# Altium PCB PCB.PcbDoc
Units mil, origin at the board's own origin, x right, y up, seen from the top; angles counter-clockwise.
Board outline 6000 x 4000 mil, 2 copper layers (Top Layer, Bottom Layer); 40 components, 27 nets, 94 pads, 5 vias.
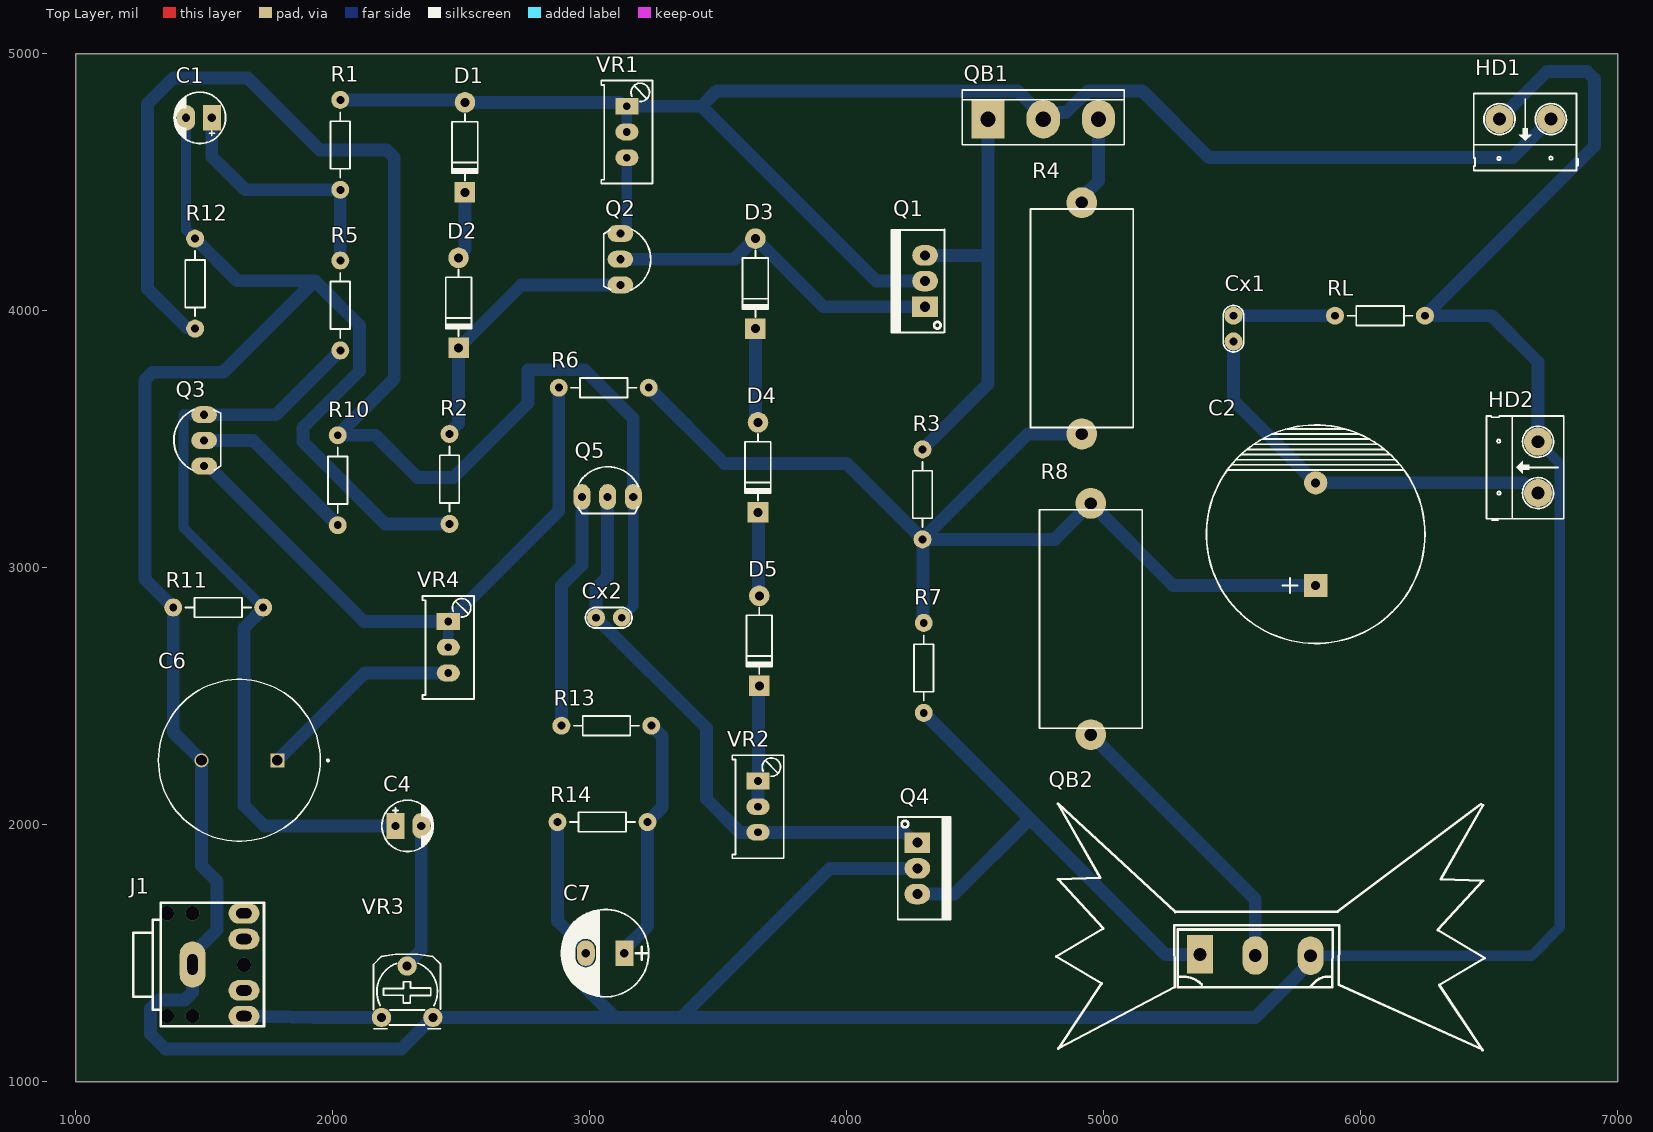
[diagram p0: Top Layer view]
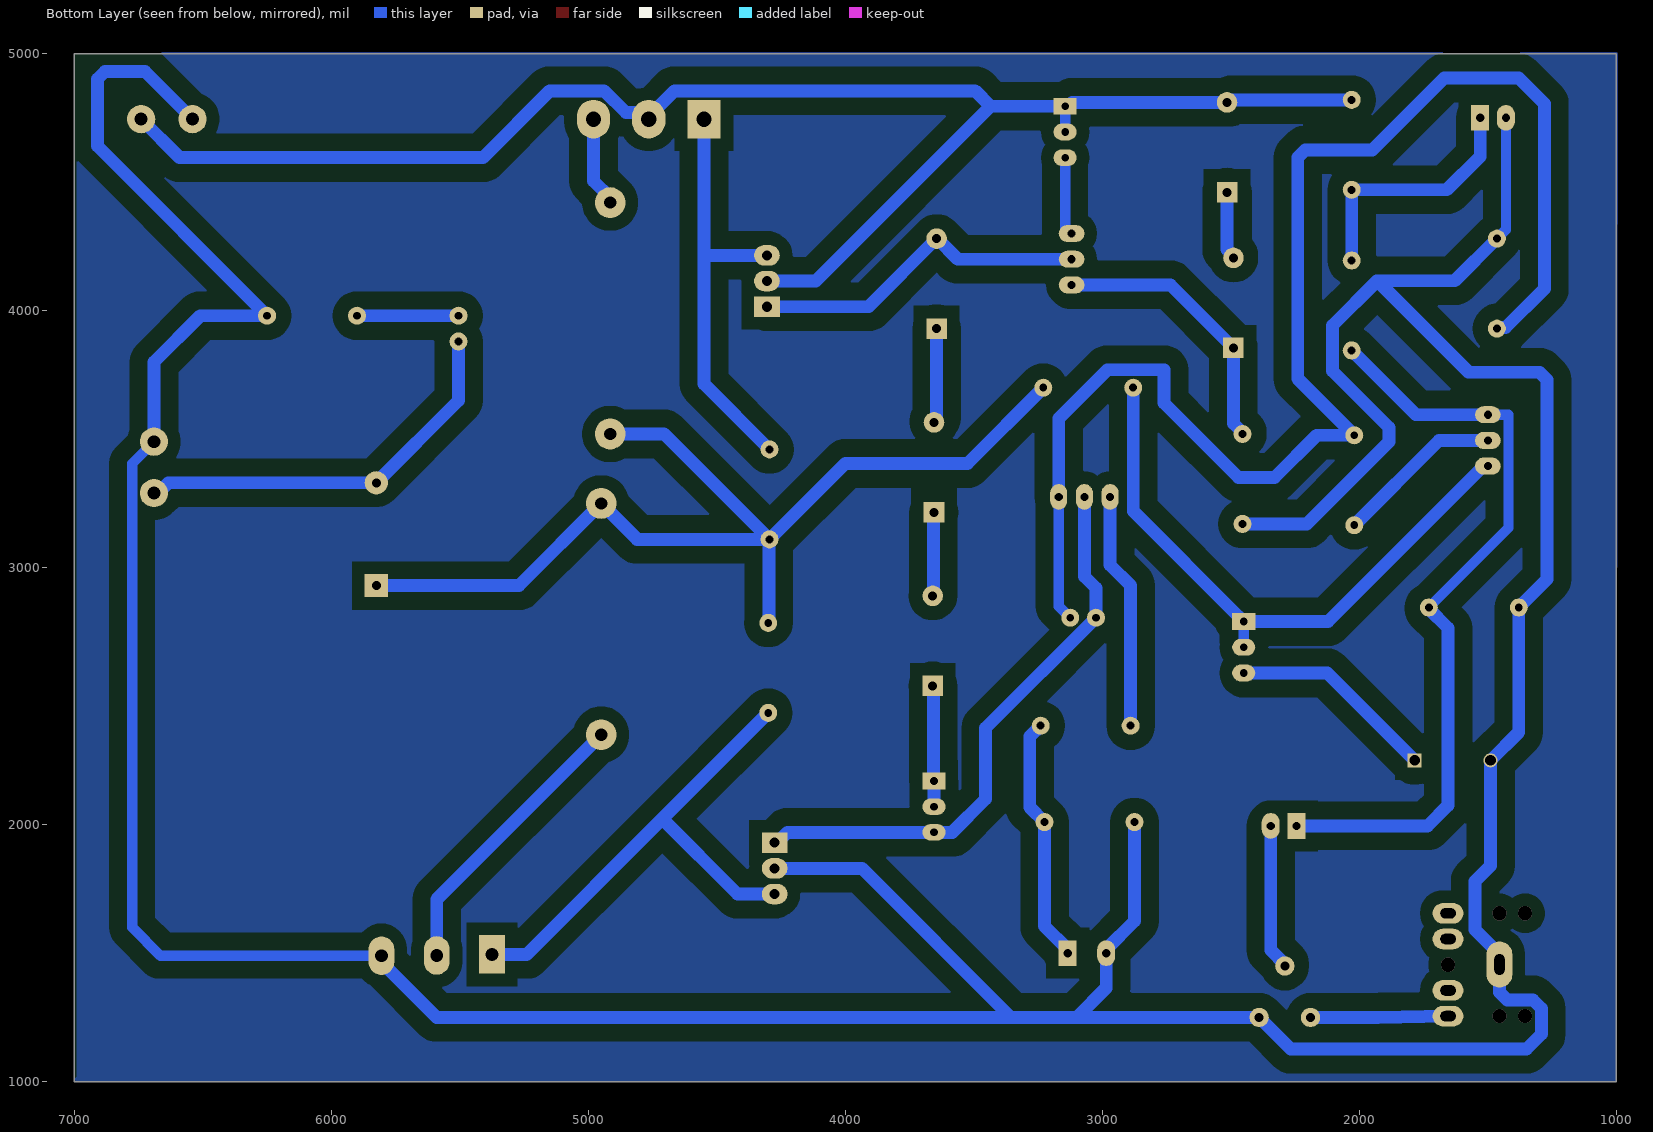
[diagram p1: Bottom Layer view, seen from below]
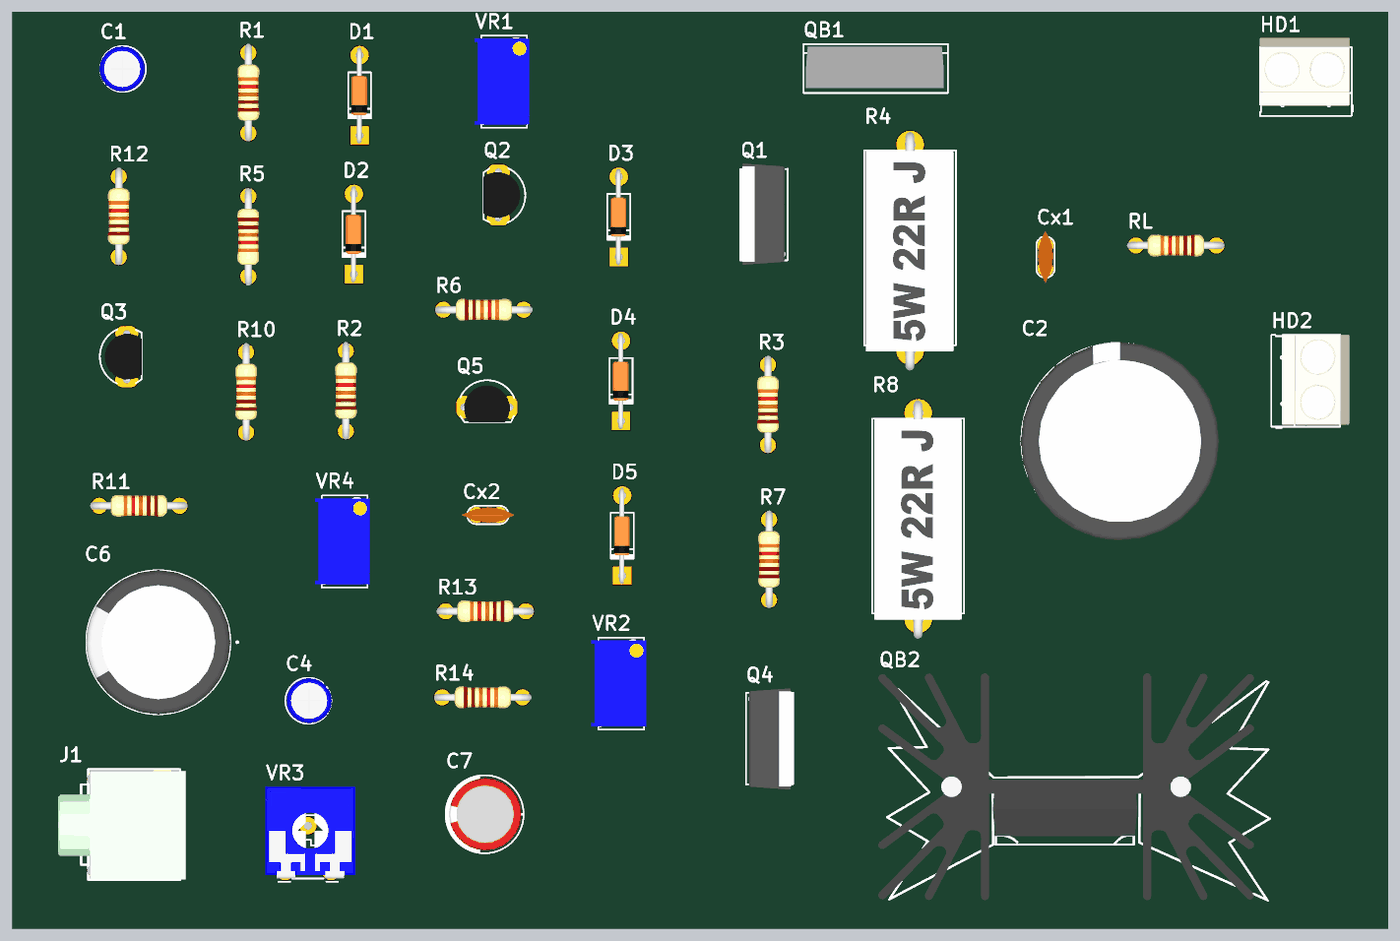
[diagram p2: 3D render of the assembled board from above, using the file's embedded part models]

## Layer stack, top to bottom
Top Solder: solder mask 0.4, Solder Resist, Dk 3.5
Top Layer: signal copper 1.4
Dielectric 1: dielectric 12.6, FR-4, Dk 4.8
Bottom Layer: signal copper 1.4
Bottom Solder: solder mask 0.4, Solder Resist, Dk 3.5

## Board outline
1000,1000 7000,1000 7000,5000 1000,5000

## Design rules (kind name [scope] priority, off if disabled: settings)
Clearance [All] p1: gap=10 ignorepadtopadclearanceinfootprint=FALSE except(0: Arc-Hole Track-Hole SMDPad-Hole THPad-Hole Via-Hole Fill-Hole Poly-Hole Region-Hole Text-Hole; 50: SMDPad-Fill SMDPad-Poly SMDPad-Region THPad-Fill THPad-Poly THPad-Region Via-Fill Via-Poly Via-Region Fill-Fill Fill-Poly Fill-Region Poly-Poly Poly-Region Region-Region; 70: Arc-Fill Arc-Poly Arc-Region Track-Fill Track-Poly Track-Region)
PolygonConnect [All] p1: connectstyle=Relief reliefconductorwidth=10 reliefentries=4 polygonreliefangle="90 Angle" airgapwidth=10
RoutingLayers [All] p1: top layer_v5=FALSE bottom layer_v5=TRUE
RoutingVias [All] p1: holewidth=28 width=50 viastyle="Through Hole" minholewidth=28 minwidth=50 maxholewidth=28 maxwidth=50
SolderMaskExpansion [All] p1: expansion=4 istentingtop=FALSE
Width [All] p1: maxlimit=80 minlimit=10 preferedwidth=50 toplayer_maxwidth=10 toplayer_prefwidth=10 bottomlayer_minwidth=50 minimp=50.000000 maximp=50.000000 favimp=50.000000
29 further rules are at their usual default settings.

## Components (designator, comment, footprint, x,y, rotation, side; value= is the part's Value field where it differs from the comment)
C1 "0.1uF" CP1/2 1530,4750 r180 top value=10uF/50V
C2 "10000uF" CP4/8.5 5825,2930 r90 top value=4700uF/50V
C4 "0.56uF" CP1/2 2245,1995 r0 top value=10uF/50V
C6 "470uF/100V" CAPPRD750W80D1600H2500 1637.36,2250 r180 top
C7 "330uF/35V" CP1.5/3.4 3135,1500 r180 top value=100uF/35V/50V
Cx1 "1nF" CN1 5505,3930 r270 top value=100pF
Cx2 "150pF" CN1 3075,2805 r180 top value=100pF
D1 "1N4007" D1A 2515,4810 r90 top
D2 "1N4007" D1A 2490,4205 r90 top
D3 "1N4007" D1A 3645,4280 r90 top
D4 "1N4007" D1A 3655,3565 r90 top
D5 "1N4007" D1A 3660,2890 r90 top
HD1 "Header 2" HED2 6740,4745 r180 top
HD2 "Header 2" HED2 6690,3290 r90 top
J1 "Jac Phone2" JacPhone2 1555,1455 r90 top
Q1 "TIP41C" QTO-220 4305,4015 r90 top
Q2 "A1015" QTO-92 3120,4200 r270 top
Q3 "A1015" QTO-92 1500,3495 r90 top
Q4 "TIP42C" QTO-220 4275,1930 r270 top
Q5 "C2383" QTO-92 3070,3275 r0 top value=C1815
QB1 "D718" QTO-247 4550,4745 r0 top
QB2 "2SB688" TO247+LageHeatsink 5390,1490 r0 top value=B688
R1 "Res1" R1/4W 2030,4820 r270 top value=680k
R2 "Res1" R1/4W 2455,3520 r270 top value=10k
R3 "Res1" R1/4W 4295,3460 r270 top value=220
R4 "R5W - 0,47" R5W 4915,3520 r90 top value="R5W - 0,47R"
R5 "Res1" R1/4W 2030,3845 r90 top value=270k
R6 "Res1" R1/4W 3230,3700 r180 top value=20k
R7 "Res1" R1/4W 4300,2785 r270 top value=220
R8 "R5W - 0,47" R5W 4950,2350 r90 top value="R5W - 0,47R"
R10 "Res1" R1/4W 2020,3515 r270 top value=33k
R11 "Res1" R1/4W 1380,2845 r0 top value=820k
R12 "Res1" R1/4W 1465,4280 r270 top value=6k8
R13 "Res1" R1/4W 2890,2385 r0 top value=47
R14 "Res1" R1/4W 3225,2010 r180 top value=100
RL "Res1" R1/4W 5900,3980 r0 top value=4.7
VR1 "100" VR1 3145,4795 r270 top value="VR 10K"
VR2 "100" VR1 3655,2170 r270 top value="VR 10K"
VR3 "50k" VR 2190,1250 r0 top value="VR 10K"
VR4 "5k" VR1 2450,2790 r270 top value="VR 10K"

## Footprints (in the part's own frame and the unit in brackets; to place one, negate y for a bottom-side part, rotate by r counter-clockwise, add the part's x,y. Pads: shape width x height; smd on the part's side, far side on the other; paste and mask are expansions set on the pad)
CAPPRD750W80D1600H2500 [mm]
  round 1.4 hole 1.05: N(3.75,0)
  rect 1.4x1.4 hole 1.05: P(-3.75,0)
  silkscreen extent -8.85,-8 8,8, body extent -8,-8 8,8, height 25
CN1 [mil]
  round 70 hole 31: 1(-50,0) 2(50,0)
  silkscreen extent -90,-40 91,40, body extent -115,-33 115,33, height 265
CP1.5/3.4 [mil] "Tu hoa 220->470uF,16V, 470uF/16V,25V"
  rect 70x100 hole 32: 1(0,0)
  oval 70x100 hole 32: 2(150,0)
  silkscreen extent -95,-170 245,170, body extent -85,-157 230,157, height 446
CP1/2 [mil] "Tu hoa < 22uF/16>50V"
  rect 70x100 hole 32: 1(0,0)
  oval 70x100 hole 32: 2(100,0)
  silkscreen extent -53,-100 147,100, body extent -49,-99 149,99, height 287
CP4/8.5 [mil] "Tu hoa 4700uF/50V"
  rect 90x90 hole 35: 1(0,0)
  round 90 hole 35: 2(400,0)
  silkscreen extent -225,-425 625,425, body extent -236,-438 630,428, height 984
D1A [mil] "Diode 1A, W 100mil, L 350mil"
  round 80 hole 35: 1(0,0)
  rect 80x80 hole 35: 2(-350,0)
  silkscreen extent -305,-50 -45,50, body extent -386,-33 34,36, height 84
HED2 [mil] "Header 2, 2 pin, hight 300mil, Pin to Pin 200, Colour Green"
  round 110 hole 50: 1(0,0) 2(200,0)
  silkscreen extent -106,-100 300,200, body extent -92,-140 302,155, height 394
JacPhone2 [mil] "Jac Phone Stereo"
  oval 80x120 hole 40 slot 60 at 90 deg: 1(-200,-100) 2(-100,-100) 3(100,-100) 4(200,-100)
  oval 180x100 hole 40 slot 80 at 0 deg: 5(1,100)
  silkscreen extent -240,-178 241,330, body extent -239,-202 233,354, height 394
QTO-92 [mil] "TO-92"
  oval 66x100 hole 32: 1(-100,0) 2(0,0) 3(100,0)
  silkscreen extent -117,-65 120,118, body extent -109,-66 109,95, height 245
QTO-220 [mil] "TO-220 - 1-2-3"
  rect 80x100 hole 39: 1(0,0)
  oval 80x100 hole 39: 2(100,0) 3(200,0)
  silkscreen extent -100,-76 300,130, body extent -119,-64 322,121, height 755
QTO-247 [mil] "TO-247"
  rect 130x150 hole 60: 1(0,0)
  oval 130x150 hole 60: 2(215,0) 3(430,0)
  silkscreen extent -100,-100 530,113, body extent -89,-78 511,102, height 941
R1/4W [mil] "R 1/4W, 2 Pin, 350mil"
  round 70 hole 31: 1(0,0) 2(350,0)
  silkscreen extent 48,-38 302,38, body extent -40,-47 386,47, height 111
R5W [mil] "R5W , 2 pin, 400 x 950mil"
  round 120 hole 47.24: 1(0,0) 2(900,0)
  silkscreen extent 25,-200 875,200, body extent -85,-190 955,192, height 363
TO247+LageHeatsink [mil]
  rect 100x150 hole 50: 1(-15,5)
  oval 100x150 hole 50: 2(200,1) 3(415,0)
  silkscreen extent -575,-367 1093,592, body extent -614,-365 1024,625, height 2600
VR [mil] "Resistor Variable"
  round 75 hole 35: 1(0,0) 2(100,200) 3(200,0)
  silkscreen extent -31,-44 231,246, body extent -87,-30 307,372, height 165
VR1 [mil] "Variable Resistor"
  rect 65x90 hole 30: 1(0,0)
  oval 65x90 hole 30: 2(100,0) 3(200,0)
  silkscreen extent -100,-100 301,100, body extent -88,-130 288,110, height 455

## Part data
C1 C4: library part CP1, "Cap P  0,1uF < 22uF , 16 - 50V", Description 1="10 => 220uF/6,3V/10V - 10uF => 100uF/16V", Description 2="0,1uF => 33uF/50V - 10uF => 22uF/63V", Description 3="0,47uF => 10uF/100V"
C2: library part CP7, "Cap 4700uF/50V"
C6: library part ECA2AHG471, "470ÂµF 100V Aluminum Electrolytic Capacitors Radial, Can 2000 Hrs @ 105Â°C", Package="RADIAL-2 Panasonic", Availability="In Stock", Check_prices=https://www.snapeda.com/parts/ECA2AHG471/Panasonic/view-part/?ref=eda, MF=Panasonic, MP=ECA2AHG471, Price=None, SnapEDA_Link=https://www.snapeda.com/parts/ECA2AHG471/Panasonic/view-part/?ref=snap
C7: library part CP3, "Cap 100uF/35V - 470uF/16V", Description 1="1000uF/6,3V - 470uF/16V - 330uF - 25V", Description 2="220uF/35V - 100uF/50V - 63V - 4,7uF/200V", Description 3="22uF => 33uF100V - 3,3uF => 4,7uF/250V", Description 4="2,2uF =>3,3uF/350 - 2,2uF/400V - 1uF/450V"
Cx1 Cx2: library part CN1, "Cap np  1pF - 472pF"
D1 D2 D3 D4 D5: library part D1A, "Diode 1A"
HD1 HD2: library part Hed2, "Header 2 (Green)"
J1: "Jac Phone Stereo", Creat by=VanDungEvn@Gmail.com
Q1: "NPN 2W, BCE"
Q2 Q3: "PNP 600mW, ECB"
Q4: "PNP 2W, BCE"
Q5: library part NPN_ECB, "P 600mW, ECB"
QB1 QB2: "Transistor Power Supply"
R1 R2 R3 R5 R6 R7 R10 R11 R12 R13 R14 RL: library part Res1_1, "Resistor", Manufacturer="Generic Components", Class=Passive, Published=08/06/2000, Publisher="Altium Hobart Technology Centre", SubClass=Resistor
R4 R8: library part R5W, "Resistor 5W"
VR1 VR2 VR4: library part VR1, "Var Resistor"
VR3: library part VR, "Var Resistor"

## Via types
v1: diameter 55, hole 55, Top Layer to Bottom Layer, 5 vias

## Nets (pads, with @x,y where several pads share a name; then routed paths per layer and width w, separated by ;. In a path a pad name is that pad's centre, name@x,y a point inside that pad or via, vN(x,y) a via of type N, cw(c..) or ccw(c..) an arc to the next point about the centre after c; other vN are vias at no path point)
GND: C1.2 C6.N C7.2 HD1.2 HD2.2 J1.5 Q4.2 QB2.3 R2.2 R11.1 R12.1 R14.2 RL.2 VR3.3 | length 18291.5
  Bottom Layer w40: C1.2 1430,4315 R12.1 ; QB2.3 6665,1490 6775,1600 6775,3405 HD2.2
  Bottom Layer w50: R12.1 1629,4116 1931,4116 ; R2.2 2205,3170 1885,3490 1885,3545 2105,3765 2105,3942 1931,4116 ; R14.2 2875,1625 2985,1515 C7.2 2985,1365 3100,1250 ; Q4.2 3935.02,1830 3355.02,1250 ; QB2.3 5805,1465 5590,1250 3355.02,1250 ; HD1.2 6725,4930 6880.71,4930 6910,4900.71 6910,4640 RL.2 6510,3980 6690,3800 HD2.2 ; 1931,4116 1575,3760 1299.29,3760 1270,3730.71 1270,2955 R11.1 1380,2359.72 C6.N 1489.72,1840.28 1550,1780 1550,1591 1455,1496 J1.5 1455,1348 1425,1318 1325,1318 1292,1285 1292,1185 1350,1127 2267,1127 VR3.3 3100,1250 ; 3100,1250 3355.02,1250
NetC1_1: C1.1 R1.2 R5.2 | length 978.8
  Bottom Layer w50: C1.1 1530,4600 1660,4470 R1.2 R5.2
NetC2_1: C2.1 R3.2 R4.1 R6.1 R7.1 R8.2 | length 4146.8
  Bottom Layer w50: R6.1 3525,3405 4000,3405 R3.2 ; R7.1 4297.5,2787.5 4297.5,3107.5 R3.2 ; R4.1 4705,3520 R3.2 ; C2.1 5270,2930 R8.2 4810,3110 R3.2
NetC2_2: C2.2 Cx1.2 HD2.1 | length 1564.1
  Bottom Layer w50: Cx1.2 5505,3650 C2.2 6633.76,3330 6673.76,3290 HD2.1
NetC4_1: C4.1 Q3.3 R5.1 R11.2 | length 3016.2
  Bottom Layer w40: Q3.3 1420,3595 1420,3155 R11.2
  Bottom Layer w50: Q3.3 1780,3595 R5.1 ; R11.2 1730,2839.59 1655,2764.59 1655,2075 1735,1995 C4.1
NetC4_2: C4.2 VR3.2 | length 567.8
  Bottom Layer w50: VR3.2 2290,1456.76 2345,1511.76 C4.2
NetC6_P: C6.P VR4.3 | length 805.8
  Bottom Layer w50: C6.P 2125,2590 VR4.3
NetC7_1: C7.1 R13.2 R14.1 | length 963.7
  Bottom Layer w50: C7.1 3135,1515 3225,1605 R14.1 3282.5,2067.5 3282.5,2342.5 R13.2
NetCx1_1: Cx1.1 RL.1 | length 395
  Bottom Layer w50: Cx1.1 RL.1
NetCx2_1: Cx2.1 Q5.3 R10.1 R12.2 | length 5610.8
  Bottom Layer w40: Cx2.1 3170,2850 Q5.3
  Bottom Layer w50: R12.2 1461.17,3933.83 1431.17,3933.83 1280,4085 1280,4805 1380,4905 1670,4905 1950,4625 2210.71,4625 2240,4595.71 2240,3735 R10.1 2165.92,3515 2330.21,3350.71 2470.71,3350.71 2760,3640 2760,3770 2980,3770 3170,3580 Q5.3
NetCx2_2: Cx2.2 Q4.1 Q5.2 VR2.3 | length 2262.6
  Bottom Layer w50: Q5.2 3070,2965.21 3025,2920.21 Cx2.2 3454.29,2375.71 3454.29,2100 3584.29,1970 VR2.3 4225,1970 4265,1930 Q4.1
NetD1_1: D1.1 HD1.1 Q1.2 QB1.2 R1.1 VR1.1 VR1.2 | length 6263.7
  Bottom Layer w40: VR1.2 VR1.1
  Bottom Layer w50: R1.1 2496.88,4820 2506.88,4810 D1.1 3117.5,4810 3132.5,4795 VR1.1 3435,4795 ; Q1.2 4115,4115 3435,4795 ; HD1.1 6590,4595 5410,4595 5150,4855 4938.58,4855 4853.89,4770.31 4790.31,4770.31 QB1.2 4765,4755 4665,4855 3495,4855 3435,4795
NetD1_2: D1.2 D2.1 | length 265.4
  Bottom Layer w50: D2.1 2490,4213.12 2515,4238.12 D1.2
NetD2_2: D2.2 Q2.3 R2.1 | length 1081
  Bottom Layer w50: R2.1 2455,3525.41 2490,3560.41 D2.2 2735,4100 Q2.3
NetD3_1: D3.1 Q1.1 Q2.2 | length 1327.9
  Bottom Layer w50: Q2.2 3562.37,4200 3642.37,4280 D3.1 3910,4015 Q1.1
NetD3_2: D3.2 D4.1 | length 369.1
  Bottom Layer w50: D3.2 3645,3583.12 3655,3573.12 D4.1
NetD4_2: D4.2 D5.1 | length 327.1
  Bottom Layer w50: D4.2 3657.5,3212.5 3657.5,2892.5 D5.1
NetD5_2: D5.2 VR2.1 VR2.2 | length 472.1
  Bottom Layer w50: VR2.2 VR2.1 3657.5,2172.5 3657.5,2537.5 D5.2
NetJ1_1: J1.1 VR3.1 | length 535
  Bottom Layer w50: J1.1 1928,1250 VR3.1
NetQ1_3: Q1.3 QB1.1 R3.1 | length 1635.6
  Bottom Layer w50: R3.1 4550,3715 4550,4215 ; Q1.3 4550,4215 ; QB1.1 4550,4215
NetQ2_1: Q2.1 VR1.3 | length 320
  Bottom Layer w40: Q2.1 3145,4300 VR1.3
NetQ3_1: Q3.1 R6.2 VR4.1 VR4.2 | length 2396
  Bottom Layer w40: VR4.2 VR4.1
  Bottom Layer w50: Q3.1 1517,3395 2122,2790 VR4.1 2462.5,2790 2470,2797.5 2470,2810 2880,3220 R6.2
NetQ3_2: Q3.2 R10.2 | length 656.7
  Bottom Layer w50: Q3.2 1690,3495 R10.2
NetQ4_3: Q4.3 QB2.1 R7.2 | length 2023
  Bottom Layer w50: Q4.3 4420,1730 4712.5,2022.5 ; R7.2 4712.5,2022.5 ; QB2.1 5240,1495 4712.5,2022.5
NetQ5_1: Q5.1 R13.1 | length 923.1
  Bottom Layer w50: R13.1 2890,2930 2970,3010 Q5.1
NetQB1_3: QB1.3 R4.2 | length 351.9
  Bottom Layer w50: R4.2 4915,4438.94 4980,4503.94 QB1.3
NetQB2_2: QB2.2 R8.1 | length 1124.1
  Bottom Layer w50: R8.1 5590,1710 QB2.2
pads on no net: J1.2 J1.3 J1.4
copper on no net:
  other v1: 1355,1255 1455,1255 1655,1455 1355,1655 1455,1655

## Polygon pours and split planes (outlines as drawn)
no net on Bottom Layer "NONET_L02_P000" (solid, pour order 0): 995,5005 7000,5000 7000,1000 1000,1000